# Altium PCB Single_ETU_b_rev1.PcbDoc (part 4 of 6)
Units mil, origin at the board's own origin, x right, y up, seen from the top; angles counter-clockwise.
Board outline 5341 x 2710 mil, 10 copper layers (Top Layer, GND1, Signal 1, GND2, VDDA, VDD, GND3, Signal 2, GND4, Bottom Layer), stack 59.76 mil thick; 283 components, 478 nets, 1863 pads, 875 vias.
Unrouted connection lines stored in the file: 3.
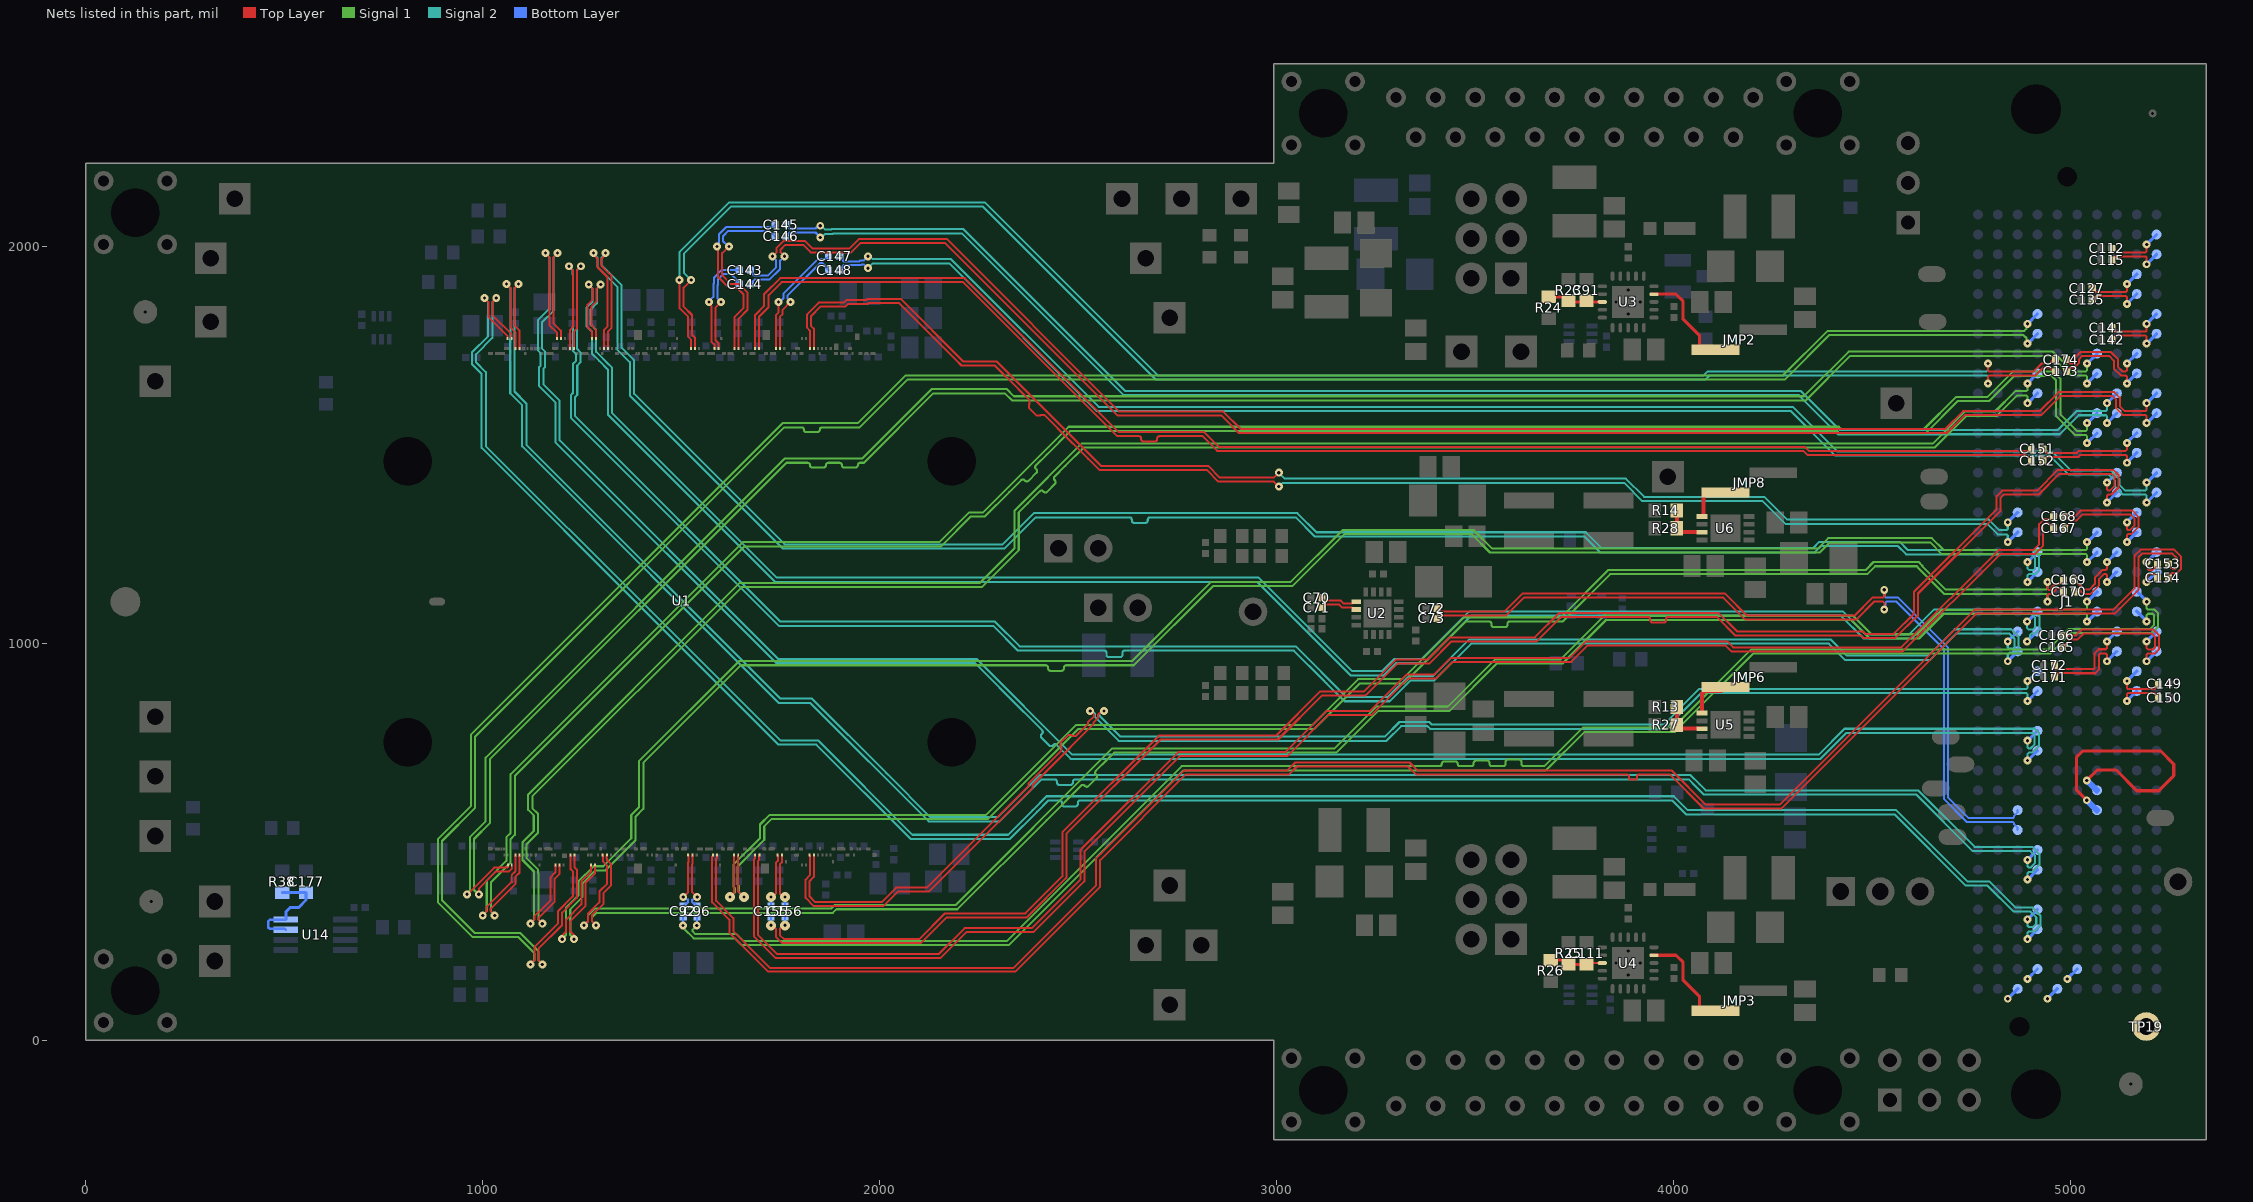
[diagram p12: the nets of this part, all layers, seen from the top]

## Via types
v1: diameter 20, hole 8, Top Layer to Bottom Layer, tented bottom, 402 vias
v2: diameter 20, hole 8, Top Layer to Bottom Layer, 199 vias
v3: diameter 30, hole 16, Top Layer to Bottom Layer, 160 vias
v4: diameter 20, hole 8, Top Layer to Bottom Layer, tented top, 89 vias
v5: diameter 18, hole 8, Top Layer to Bottom Layer, 6 vias
v6: diameter 18/25/25/25/25/18 (per signal layer), hole 8, Top Layer to Bottom Layer, tented bottom, 4 vias
v7: diameter 18/20/20/20/20/18 (per signal layer), hole 8, Top Layer to Bottom Layer, tented bottom, 4 vias
v8: diameter 80, hole 42, Top Layer to Bottom Layer, 2 vias
v9: diameter 18/25/25/25/25/18 (per signal layer), hole 8, Top Layer to Bottom Layer, 2 vias
v10: diameter 20/20/20/20/20/18 (per signal layer), hole 8, Top Layer to Bottom Layer, tented bottom, 2 vias
v11: diameter 40/20/20/20/20/40 (per signal layer), hole 8, Top Layer to Bottom Layer, 2 vias
v12: diameter 20/20/20/20/20/18 (per signal layer), hole 8, Top Layer to Bottom Layer, 1 vias
v13: diameter 40/20/20/20/20/40 (per signal layer), hole 8, Top Layer to Bottom Layer, tented top, 1 vias
v14: diameter 20, hole 8, Top Layer to Bottom Layer, tented both sides, 1 vias

## Nets (pads, with @x,y where several pads share a name; then routed paths per layer and width w, separated by ;. In a path a pad name is that pad's centre, name@x,y a point inside that pad or via, vN(x,y) a via of type N, cw(c..) or ccw(c..) an arc to the next point about the centre after c; other vN are vias at no path point) (continued)
S3B_N: C96.1 U1.79 | length 149.2
  Top Layer w5.04: U1.79@1527.77,466.75 1527.77,443.82 1527.52,443.57 1527.52,373.48 v7(1540,361)
  Bottom Layer w5.04: C96.1@1540,339 1533.52,345.48 1530.47,345.48 1527.52,348.43 1527.52,355.2 1527.87,355.56 1531.05,355.56 1536.49,361 v7(1540,361) ; v7@1540,360.85 v7@1540.07,360.93
S3B_P: C92.1 U1.78 | length 149.4
  Top Layer w5.04: v7(1505,361) 1517.48,373.48 1517.48,447.73 1517.73,447.98 1517.73,466.75 U1.78@1517.5,467
  Bottom Layer w5.04: C92.1@1505,339 1511.48,345.48 1514.53,345.48 1517.48,348.43 1517.48,355.2 1517.13,355.56 1513.95,355.56 1508.51,361 v7(1505,361)
S3T_N: C173.1 U1.226 | length 3997.9
  Top Layer w5.04: v2(1525,1915) 1506.04,1896.04 1506.04,1848.16 1527.04,1827.16 1527.04,1776.93 1534.5,1769.47 U1.226@1534.5,1743 ; v1(4791,1655) 4791,1672.03 4793.95,1674.98 4910.98,1674.98 4930.98,1694.98 4946.57,1694.98 4949.52,1692.03 4949.52,1691.48 C173.1@4956,1685
  Signal 2 w5.16: v2(1525,1915) 1506.66,1933.34 1506.66,1981.66 1625,2100 2260,2100 2695.66,1664.34 4079.41,1664.34 4089.74,1674.67 4437.57,1674.67 4787.98,1674.67 4791,1671.65 v1(4791,1655)
S3T_P: C174.1 U1.225 | length 4000.3
  Top Layer w5.04: v2(1495,1915) 1496,1914 1496,1844 1517,1823 1517,1772.78 1524,1765.78 U1.225@1524,1743 ; v1(4791,1705) 4791,1687.97 4793.95,1685.02 4906.82,1685.02 4926.82,1705.02 4946.57,1705.02 4949.52,1707.97 4949.52,1708.52 C174.1@4956,1715
  Signal 2 w5.16: v2@1496,1915 1496,1986.07 1620.58,2110.66 2264.41,2110.66 2700.07,1675 4075,1675 4085.33,1685.33 4441.98,1685.33 4787.98,1685.33 4791,1688.35 v1(4791,1705)
S4B_N: C154.1 U1.89 | length 4588.8
  Top Layer w5.04: U1.89@1590.5,467 1590.48,460.42 1587.48,457.42 1587.48,416.89 1587.53,416.84 1587.53,351.74 1631.04,308.23 1631.04,275.16 1723.16,183.04 2046.21,183.04 2337.16,183.04 2545,390.88 2545,417.69 2545,458.39 2557.94,471.33 2766.65,680.04 3026.65,680.04 3046.61,700 3334.19,700 3354.16,680.04 3863.15,680.04 3994.16,680.04 4080.16,594.04 4266.52,594.04 4757.52,1085.04 5106.84,1085.04 5159.96,1138.16 5159.96,1220.48 5175.52,1236.04 5259.96,1236.04 5278,1218 5278,1188 5267.48,1177.48 5255.43,1177.48 5252.48,1174.53 5252.48,1171.48 C154.1@5246,1165
S4B_P: C153.1 U1.88 | length 4590.5
  Top Layer w5.04: U1.88@1580,467 1580,465.54 1577.44,462.98 1577.44,412.73 1577.49,412.68 1577.49,347.58 1621,304.08 1621,271 1719,173 1723.15,173 2051.22,173 2341.32,173 2555.04,386.72 2555.04,421.85 2555.04,454.23 2770.81,670 3030.8,670 3050.77,689.96 3330.04,689.96 3350,670 3778.53,670 3882.02,670 cw(c3882.02,664.96) 3887.06,664.96 3887.06,660.3 ccw(c3890.07,660.3) 3890.07,657.29 3904.09,657.29 ccw(c3904.09,660.3) 3907.1,660.3 3907.1,664.96 cw(c3912.14,664.96) 3912.14,670 3914.66,670 3990,670 4076,584 4270.68,584 4761.68,1075 5111,1075 5170,1134 5170,1216.32 5179.68,1226 5255.81,1226 5267.96,1213.84 5267.96,1192.16 5263.32,1187.52 5255.43,1187.52 5252.48,1190.47 5252.48,1193.52 C153.1@5246,1200
S4T_N: C144.1 U1.236 | length 260.2
  Top Layer w5.04: U1.236@1594,1743 1593.77,1743.23 1593.77,1756.43 1586.04,1764.16 1586.04,1797.01 1586.04,1845.59 1597.97,1857.52 v2@1601.52,1857.52
  Bottom Layer w5.04: v2@1600.49,1860 1591.04,1869.46 1591.04,1902.07 1592.56,1903.59 1592.56,1917.38 1605.14,1929.96 1626.04,1929.96 1639.52,1916.48 1639.52,1911.48 C144.1@1646,1905
  other v2: 1600,1860
S4T_P: C143.1 U1.235 | length 261.2
  Top Layer w5.04: v2@1569.55,1860 1569.55,1856.4 1576,1849.95 1576,1848.54 1576,1801.16 1576,1760 1583.73,1752.27 1583.73,1744.73 1583.5,1744.5 U1.235@1583.5,1743
  Bottom Layer w5.04: v2@1569,1860 1569,1860.91 1581,1872.91 1581,1906.22 1582.52,1907.74 1582.52,1921.54 1600.98,1940 C143.1@1646,1940
  other v2: 1570,1860
S5B_N: C170.1 U1.97 | length 3962.3
  Top Layer w5.04: U1.97@1643.27,465.27 1643.27,404.77 1643.27,375.34 v9(1657.61,361) ; v1(4941,1105) 4941,1122.03 4943.95,1124.98 4952.28,1124.98 4961.11,1133.81 4961.11,1136.65 4964.44,1139.98 4971.57,1139.98 4974.52,1137.03 4974.52,1136.48 C170.1@4981,1130
  Signal 1 w5.16: v9(1657.61,361) 1645.43,373.17 1645.43,389.06 1642,392.49 1642,438 1709,505 1709,539.34 1727,557.34 2272.41,557.34 2499.42,784.34 3094.42,784.34 3209.42,899.34 3320.42,899.34 3476.25,1055.17 3491.99,1055.17 3534.73,1055.17 cw(c3534.73,1049.15) 3540.75,1049.15 3540.75,1046.92 ccw(c3546.77,1046.92) 3546.77,1040.9 3574.89,1040.9 ccw(c3574.89,1046.92) 3580.91,1046.92 3580.91,1049.15 cw(c3586.93,1049.15) 3586.93,1055.17 3675,1055.17 3720.39,1055.17 3839.56,1174.34 4487.32,1174.34 4507.32,1194.34 4611.94,1194.34 4614.96,1191.32 4614.96,1190.18 4680.48,1124.67 4918.16,1124.67 4937.98,1124.67 4941,1121.65 v1(4941,1105)
S5B_P: C169.1 U1.96 | length 3962
  Top Layer w5.04: v9(1622.61,361) 1633.23,371.63 1633.23,400.62 1633.23,466.77 U1.96@1633,467 ; v1(4941,1155) 4941,1137.97 4943.95,1135.02 4948.12,1135.02 4951.07,1137.97 4951.07,1140.81 4960.29,1150.02 4971.57,1150.02 4974.52,1152.97 4974.52,1153.52 C169.1@4981,1160
  Signal 1 w5.16: v9(1622.61,361) 1634.78,373.17 1634.78,383.8 1631.34,387.23 1631.34,442.41 1698.34,509.41 1698.34,543.76 1722.59,568 2268,568 2495,795 3090,795 3205,910 3316,910 3471.83,1065.83 3715.98,1065.83 3835.15,1185 4482.91,1185 4502.91,1205 4616.36,1205 4625.62,1195.73 4625.62,1194.6 4684.89,1135.33 4912.84,1135.33 4937.98,1135.33 4941,1138.35 v1(4941,1155)
S5T_N: C146.1 U1.244 | length 487.3
  Top Layer w5.04: v2(1620,2000) 1603.04,1983.04 1603.04,1954.51 1603.04,1926.96 1625,1905 1645,1905 1667,1883 1667,1841 1644.27,1818.27 1644.27,1743.23 U1.244@1644.5,1743
  Bottom Layer w5.04: v2(1620,2000) 1618,2000 1605,2013 1605,2026 1618,2039 1722,2039 C146.1@1736,2025
S5T_P: C145.1 U1.243 | length 489.5
  Top Layer w5.04: v2(1590,2000) 1592.48,1997.52 1592.48,1991.09 1593,1990.57 1593,1922.81 1620.84,1894.96 1640.84,1894.96 1656.96,1878.84 1656.96,1845.16 1634.23,1822.43 1634.23,1744.73 1634,1744.5 U1.243@1634,1743
  Bottom Layer w5.04: v2(1590,2000) 1590,2003.51 1594.96,2008.47 1594.96,2030.16 1613.84,2049.04 1730.04,2049.04 C145.1@1736,2055
S6B_N: C168.1 U1.105 | length 4027.5
  Top Layer w5.04: U1.105@1696.5,467 1696.5,465.5 1696.27,465.27 1696.27,454.73 1693,451.46 1693,266.3 1742.2,217.1 2147.9,217.1 2213.75,282.94 2382.9,282.94 2504.96,405 2504.96,479.16 2512.94,487.13 2752.84,727.04 3022.84,727.04 3125.8,830 3235,830 3327.04,922.04 3367.06,922.04 3397.04,922.04 3438.55,963.55 3737.64,963.55 3779.13,1005.04 4134.16,1005.04 4149.16,990.04 4572.84,990.04 4817.81,1235 4904.81,1235 4919.96,1250.16 4919.96,1300.16 4933.76,1313.95 4949.95,1313.95 C168.1@4956,1320
S6B_P: C167.1 U1.104 | length 4047.4
  Top Layer w5.04: U1.104@1686,467 1686.23,466.77 1686.23,458.89 1682.96,455.62 1682.96,262.14 1738.04,207.06 1742.2,207.06 2016.28,207.06 2152.06,207.06 2217.9,272.9 2387.06,272.9 2515,400.84 2515,475 2757,717 3027,717 3129.96,819.96 3239.16,819.96 3331.2,912 3362.9,912 3401.2,912 3442.71,953.51 3741.8,953.51 3783.29,995 4130,995 4145,980 4577,980 4821.96,1224.96 4908.96,1224.96 4930,1246 4930,1296 4937.91,1303.91 4942.09,1303.91 C167.1@4956,1290
S6T_N: C152.1 U1.252 | length 3541.9
  Top Layer w5.04: U1.252@1696,1743 1695.98,1745.98 1695.77,1746.2 1695.77,1767.58 1695.77,1822.77 1720.26,1847.26 1720.26,1877.26 1752.96,1909.96 2210.04,1909.96 2598,1522 2609.87,1522 2652.43,1522 cw(c2652.43,1515.99) 2658.44,1515.99 2658.44,1514.48 ccw(c2664.44,1514.48) 2664.44,1508.47 2692.47,1508.47 ccw(c2692.47,1514.48) 2698.47,1514.48 2698.47,1515.99 cw(c2704.48,1515.99) 2704.48,1522 2744.01,1522 2812.93,1522 2849.93,1485 2910.86,1485 4325.81,1485 4336.81,1474 4345.12,1474 4887,1474 C152.1@4901,1460
S6T_P: C151.1 U1.251 | length 3538.5
  Top Layer w5.04: U1.251@1685.5,1743 1685.5,1744.5 1685.73,1744.73 1685.73,1826.93 1708.87,1850.06 1708.87,1880.06 1748.81,1920 2214.19,1920 2602.16,1532.04 2817.09,1532.04 2854.09,1495.04 4329.96,1495.04 4340.97,1484.04 4887,1484.04 4895.04,1484.04 C151.1@4901,1490
S7B_N: C156.1 U1.113 | length 137.5
  Top Layer w5.04: U1.113@1754,467 1754,465.5 1753.27,464.77 1753.27,448.29 1748.52,443.54 1748.52,369.97 1757.49,361 v6(1761,361)
  Bottom Layer w5.04: C156.1@1761,339 v6(1761,361)
S7B_P: C155.1 U1.112 | length 137.5
  Top Layer w5.04: v6(1726,361) 1729.51,361 1738.48,369.97 1738.48,447.69 1743.23,452.44 1743.23,466.27 U1.112@1742.5,467
  Bottom Layer w5.04: C155.1@1726,339 v6(1726,361)
S7T_N: C148.1 U1.260 | length 297.9
  Top Layer w5.04: U1.260@1748.5,1743 1748.27,1743.23 1748.27,1822.69 1755.04,1829.46 1755.04,1840.04 v2(1775,1860)
  Bottom Layer w5.04: v2@1780,1860 1776.49,1860 1767.76,1868.73 1767.76,1876.37 1849.39,1958 1856,1958 1864.52,1949.48 1864.52,1946.48 C148.1@1871,1940
S7T_P: C147.1 U1.259 | length 300.6
  Top Layer w5.04: U1.259@1738,1743 1738,1744.5 1738.23,1744.73 1738.23,1826.85 1745,1833.61 v2(1745,1860)
  Bottom Layer w5.04: v2(1745,1860) 1748.51,1860 1757.24,1868.73 1757.24,1880.73 1845.03,1968.52 1864.52,1968.52 C147.1@1871,1975
SC_CLOCK_IN_B_N: J1.D9 U1.10 | length 5049.6
  Top Layer w5: 1073,432.86 U1.10@1073,442
  Top Layer w5.04: v2(990,368) 991,369 991,383 1033,425 1065.14,425 1073,432.86
  Signal 1 w5.16: v2(990,368) 989,368 978,379 978,507.34 1018,547.34 1018,707.93 1765.07,1455 1775.43,1455 1818.17,1455 cw(c1818.17,1448.98) 1824.19,1448.98 ; 1824.19,1448.97 ccw(c1830.22,1448.97) 1830.22,1442.95 1858.33,1442.95 ccw(c1858.33,1448.97) 1864.35,1448.97 ; 1864.35,1448.98 cw(c1870.38,1448.98) 1870.38,1455 1898.49,1455 cw(c1898.49,1448.98) 1904.51,1448.98 ; 1904.51,1448.97 ccw(c1910.54,1448.97) 1910.54,1442.95 1938.65,1442.95 ccw(c1938.65,1448.97) 1944.67,1448.97 ; 1944.67,1448.98 cw(c1950.69,1448.98) 1950.69,1455 1960.07,1455 1960.84,1455.76 2135.07,1630 2315,1630 2333.12,1611.88 4332.1,1611.88 4444.56,1724.34 4950.66,1724.34 5000.33,1674.67 5037.98,1674.67 5041,1671.65 v1(5041,1655)
  Bottom Layer w8: v1(5041,1655) J1.D9@5066,1680
SC_CLOCK_IN_B_P: J1.D8 U1.9 | length 5046.6
  Top Layer w5: 1063,437.05 U1.9@1063,442
  Top Layer w5.04: v2(960,368) 961.81,368 1028.84,435.04 1060.98,435.04 1062.97,437.03
  Signal 1 w5.16: v2(960,368) 960,371.1 967.34,378.44 967.34,511.76 1007.34,551.76 1007.34,712.34 1760.66,1465.66 1955.66,1465.66 2130.66,1640.66 2319.41,1640.66 2337.54,1622.54 4327.69,1622.54 4440.15,1735 4955.07,1735 5004.74,1685.33 5037.98,1685.33 5041,1688.35 v1(5041,1705)
  Bottom Layer w8: v1(5041,1705) J1.D8@5066,1730
SC_CLOCK_IN_T_N: J1.G37 U1.157 | length 5132.7
  Top Layer w5.04: v1(1034,1870) 1034,1869.55 1024.02,1859.57 1024.02,1826.91 1072.77,1778.16 1072.77,1768.23 U1.157@1073,1768
  Signal 2 w5.16: v1(1034,1870) 1034,1869.23 1024.33,1859.56 1024.33,1769.39 983.47,1728.53 983.47,1707.53 1008,1683 1008,1497 1421.85,1083.15 1749.34,755.66 1844.34,755.66 2081.92,518.08 2323.08,518.08 2384.93,579.93 2420,615 4000.07,615 4035.07,580 4560.07,580 4739.42,400.66 4794.42,400.66 4860.07,335 4902.84,335 4923.42,314.41 4923.42,289.73 4908.37,274.67 4894.02,274.67 4891,271.65 v1(4891,255)
  Bottom Layer w8: v1(4891,255) J1.G37@4916,280
SC_CLOCK_IN_T_P: J1.G36 U1.156 | length 5134.7
  Top Layer w5.04: v2(1004,1870) 1004,1869.55 1013.98,1859.57 1013.98,1822.75 1062.73,1774 1062.73,1769.73 1062.5,1769.5 U1.156@1062.5,1768
  Signal 2 w5.16: v2(1004,1870) 1004,1869.23 1013.67,1859.56 1013.67,1773.81 972.81,1732.95 972.81,1703.12 997.34,1678.58 997.34,1492.58 1411.19,1078.73 1744.93,745 1839.93,745 2077.51,507.42 2327.49,507.42 2396.23,576.16 2424.41,604.34 2434.98,604.34 2452.6,604.34 cw(c2452.6,598.32) 2458.63,598.32 2458.63,595.36 ccw(c2464.65,595.36) 2464.65,589.34 2492.76,589.34 ccw(c2492.76,595.36) 2498.78,595.36 2498.78,598.32 cw(c2504.81,598.32) 2504.81,604.34 2507.39,604.34 3995.66,604.34 4030.66,569.34 4555.66,569.34 4735,390 4790,390 4855.66,324.34 4898.42,324.34 4912.76,310 4912.76,294.14 4903.95,285.33 4894.02,285.33 4891,288.35 v1(4891,305)
  Bottom Layer w8: v1(4891,305) J1.G36@4916,330
SC_CLOCK_OUT_B_N: J1.G7 U1.32 | length 5497.9
  Top Layer w5: 1231,436 1237.03,429.97
  Top Layer w5.04: v2(1150,191) 1150,191.43 1140,201.43 1140,230.81 1199.99,290.8 1199.99,321.8 1237.03,358.84 1237.03,429.97 ; U1.32@1231,467 1231,465.5 1231,436 1231.06,435.94
  Signal 1 w5.16: v2(1150,191) 1150,191.77 1140.33,201.44 1140.33,224.67 1094.34,270.66 979.41,270.66 897.42,352.65 897.42,502.42 980.66,585.66 980.66,765.58 1759.42,1544.34 1760,1544.34 1802.74,1544.34 cw(c1802.74,1538.32) 1808.76,1538.32 ccw(c1814.79,1538.32) 1814.79,1532.29 1842.9,1532.29 ccw(c1842.9,1538.32) 1848.92,1538.32 cw(c1854.95,1538.32) 1854.95,1544.34 1880.17,1544.34 1949.34,1544.34 2069.34,1664.34 4279.34,1664.34 4391.76,1776.76 4880.56,1776.76 4888.16,1769.16 4888.16,1757.84 v1(4891,1755)
  Bottom Layer w8: v1(4891,1755) J1.G7@4916,1780
SC_CLOCK_OUT_B_P: J1.G6 U1.31 | length 5498.9
  Top Layer w5.04: v2(1120,191) 1120,191.74 1129.7,201.43 1129.7,231.18 1129.96,231.45 1129.96,234.96 1189.96,294.96 1189.96,325.96 1227,363 1227,425.81 1220.96,431.84 1220.96,466.54 U1.31@1220.5,467
  Signal 1 w5.16: v2(1120,191) 1120,191.77 1129.67,201.44 1129.67,220.26 1089.93,260 975,260 886.76,348.24 886.76,506.84 970,590.07 970,770 1755,1555 1944.93,1555 2064.93,1675 4274.93,1675 4387.35,1787.42 4882.65,1787.42 4888.16,1792.93 4888.16,1802.16 v1(4891,1805)
  Bottom Layer w8: v1(4891,1805) J1.G6@4916,1830
SC_CLOCK_OUT_T_N: J1.H23 U1.179 | length 4763.8
  Top Layer w5: U1.179@1230,1743 1230,1785.83 1234.17,1790 ; 1234.19,1790 1237.04,1792.84
  Top Layer w5.04: 1237.02,1922.03 1237.02,1939.57 1247,1949.55 v2(1247,1950) ; 1237.04,1792.84 1237.04,1922.01
  Signal 2 w5.16: v2(1247,1950) 1247,1949.23 1237.33,1939.56 1237.33,1934.25 1237.42,1934.16 1237.42,1741.72 1246.02,1733.12 1246.02,1707.69 1238,1699.67 1238,1626.25 1232.42,1620.67 1232.42,1572.58 1750,1055 2290.07,1055 2352.44,992.63 3047.37,992.63 3175.04,864.96 3279.96,864.96 3332.54,917.54 3392.46,917.54 3484.93,1010 4394.6,1010 4435.2,969.4 4641.01,969.4 4707.27,1035.66 4849.41,1035.66 4868.66,1016.41 4868.66,983.58 4861.68,976.6 4845.95,976.6 4841,971.65 v1(4841,955)
  Bottom Layer w8: v1(4841,955) J1.H23@4866,980
SC_CLOCK_OUT_T_P: J1.H22 U1.178 | length 4765
  Top Layer w5: U1.178@1220,1743 1220,1790
  Top Layer w5.04: v2(1217,1950) 1217,1949.55 1226.98,1939.57 1226.98,1917.87 1227,1797 1220,1790
  Signal 2 w5.16: v2(1217,1950) 1217,1949.23 1226.67,1939.56 1226.67,1929.84 1226.76,1929.74 1226.76,1737.3 1235.36,1728.71 1235.36,1712.1 1227.34,1704.09 1227.34,1630.67 1221.76,1625.09 1221.76,1568.16 1745.58,1044.34 2285.66,1044.34 2348.03,981.97 2478.97,981.97 2564.94,981.97 cw(c2564.94,975.95) 2570.96,975.95 2570.96,971.52 ccw(c2576.98,971.52) 2576.98,965.49 2605.1,965.49 ccw(c2605.1,971.52) 2611.12,971.52 2611.12,975.95 cw(c2617.14,975.95) 2617.14,981.97 2619.72,981.97 3042.95,981.97 3117.46,907.46 3125,899.93 3167.5,857.43 3170.62,854.3 3284.38,854.3 3336.95,906.88 3396.88,906.88 3489.34,999.34 4390.18,999.34 4430.78,958.74 4645.42,958.74 4711.68,1025 4845,1025 4858,1012 4858,989.68 4855.58,987.26 4844.02,987.26 4841,990.28 v1(4841,1005)
  Bottom Layer w8: v1(4841,1005) J1.H22@4866,1030
SC_DATA_IN_B_N: J1.D11 U1.11 | length 5133.6
  Top Layer w5: 1073,400 1073,417.2 ; 1073.03,417.2 1080.05,424.22 ; 1080.05,424.25 1083,427.2 U1.11@1083,467
  Top Layer w5.04: v2@1000,315.45 1009.98,325.43 1009.98,336.21 1073,399.22 1073,400
  Signal 1 w5.16: v2(1000,315) 1000,315.44 1010,325.44 1010,403 1059.58,452.58 1059.58,473.39 1059.58,511.65 1070.34,522.42 1070.34,670.41 1654.93,1255 2149.99,1255 2225.18,1330.19 2260.19,1330.19 2475.66,1545.66 4415.63,1545.66 4421.29,1540 4630,1540 4711.16,1621.16 4790.16,1621.16 4853.66,1684.66 4955.42,1684.66 4973.42,1666.65 4973.42,1576.91 5015,1535.33 5037.98,1535.33 5041,1538.35 v1(5041,1555)
  Bottom Layer w8: v1(5041,1555) J1.D11@5066,1580
SC_DATA_IN_B_P: J1.D12 U1.12 | length 5133.6
  Top Layer w5: 1083,410.03 1083,402.88 1083.04,402.84 ; 1093,423.01 1093.05,423.06 1093.05,445.37 1093,445.42 U1.12@1093,467
  Top Layer w5.04: v2@1030,315.45 1020.02,325.43 1020.02,332.05 1083.04,395.07 1083.04,402.84 ; 1083.02,410.05 1083.02,413.03 1093,423.01
  Signal 1 w5.16: v2(1030,315) 1030,316.1 1020.66,325.44 1020.66,398.58 1070.24,448.17 1070.24,478.72 1070.24,507.24 1081,518 1081,666 1659.34,1244.34 2154.41,1244.34 2229.6,1319.53 2264.6,1319.53 2325.99,1380.92 2356.21,1411.14 cw(c2360.47,1406.88) 2364.73,1411.14 2366.18,1409.7 ccw(c2370.44,1413.96) 2374.7,1409.7 2394.58,1429.57 ccw(c2390.32,1433.83) 2394.58,1438.09 2393.13,1439.54 cw(c2397.39,1443.8) 2393.13,1448.06 2420.26,1475.18 2480.07,1535 4411.22,1535 4416.88,1529.34 4634.41,1529.34 4715.58,1610.5 4794.58,1610.5 4858.07,1674 4951,1674 4962.76,1662.24 4962.76,1572.49 5010.59,1524.67 5037.98,1524.67 5041,1521.65 v1(5041,1505)
  Bottom Layer w8: v1(5041,1505) J1.D12@5066,1530
SC_DATA_IN_T_N: J1.G34 U1.159 | length 5034.9
  Top Layer w5: 1080.02,1803.98 1080.02,1843.43 ; U1.159@1093,1743 1093,1786.99
  Top Layer w5.04: 1080.02,1803.98 1080.02,1799.97 1093,1786.99 ; 1080.02,1888.6 1080.02,1894.57 1090,1904.55 v2(1090,1905) ; 1080.04,1843.45 1080.04,1888.58
  Signal 2 w5.16: v2(1090,1905) 1090,1904.23 1080.33,1894.56 1080.33,1763.86 1079.86,1763.39 1079.86,1634.51 1110,1604.36 1110,1500.66 1750,860.66 1829.34,860.66 2016.23,673.77 2020,670 2127.46,562.54 2297.46,562.54 2403.05,668.12 4041.95,668.12 4064.78,645.29 4080.07,630 4615.07,630 4757.65,487.42 4902.58,487.42 4920.66,469.34 4920.66,442.62 4902.71,424.67 4894.02,424.67 4891,421.65 v1(4891,405)
  Bottom Layer w8: v1(4891,405) J1.G34@4916,430
SC_DATA_IN_T_P: J1.G33 U1.158 | length 5034.9
  Top Layer w5: 1070.02,1848.01 1070.02,1808.15 1070,1795.82 1073.02,1792.8 1083,1782.8 U1.158@1083,1743
  Top Layer w5.04: v2(1060,1905) 1060,1904.55 1069.98,1894.57 1069.98,1884.44 ; 1070,1848.02 1070,1884.42
  Signal 2 w5.16: v2(1060,1905) 1060,1904.23 1069.67,1894.56 1069.67,1768.28 1069.2,1767.8 1069.2,1630.09 1099.34,1599.95 1099.34,1496.24 1745.59,850 1824.93,850 2123.05,551.88 2301.88,551.88 2407.46,657.46 2417.31,657.46 2440.23,657.46 cw(c2440.23,651.44) 2446.25,651.44 2446.25,649.49 ccw(c2452.28,649.49) 2452.28,643.47 2480.39,643.47 ccw(c2480.39,649.49) 2486.41,649.49 2486.41,651.44 cw(c2492.43,651.44) 2492.43,657.46 2495.01,657.46 4037.54,657.46 4054.12,640.88 4075.66,619.34 4610.66,619.34 4753.24,476.76 4898.16,476.76 4910,464.93 4910,447.03 4898.3,435.33 4894.02,435.33 4891,438.35 v1(4891,455)
  Bottom Layer w8: v1(4891,455) J1.G33@4916,480
SC_DATA_OUT_B_N: J1.G10 U1.28 | length 4840.5
  Top Layer w5: 1193,423.01 U1.28@1193,442
  Top Layer w5.04: v2(1150,294) 1150,294.45 1140.02,304.43 1140.02,308.85 1142.97,311.8 1143.8,311.8 1166.58,334.58 1180.04,348.04 1180.04,406.05 1193,419.01 1193,423.01 ; v2@1151.23,295.23 1152,294.45 v2@1152,294
  Signal 1 w5.16: v2@1150,294.77 1140,304.77 1140,421.24 1139.66,421.58 1139.66,429.93 1110.66,458.93 1110.66,494.71 1139,523.05 1139,571.07 1125,585.07 1125,615 1651.88,1141.88 2256.88,1141.88 2350,1235 2350,1329.93 2372.94,1352.87 2403.16,1383.09 cw(c2407.42,1378.83) 2411.68,1383.09 2412.91,1381.86 ccw(c2417.17,1386.12) 2421.43,1381.86 2441.3,1401.74 ccw(c2437.04,1406) 2441.3,1410.26 2440.08,1411.49 cw(c2444.34,1415.75) 2440.08,1420.01 2467.54,1447.46 2513.41,1493.34 4657.41,1493.34 4737.41,1573.34 4813.41,1573.34 4864.74,1624.67 4887.98,1624.67 4891,1621.65 v1(4891,1605)
  Bottom Layer w8: v1(4891,1605) J1.G10@4916,1630
SC_DATA_OUT_B_P: J1.G9 U1.27 | length 4838
  Top Layer w5: 1180.58,420.78 1183,423.2 U1.27@1183,442
  Top Layer w5.04: v2@1122,294 1122,296.45 1129.98,304.43 1129.98,313 1138.81,321.83 1139.64,321.83 1162.42,344.62 1170,352.19 1170,410.2 1180.58,420.78
  Signal 1 w5.16: v2@1120,294.77 1120,295.44 1129,304.44 1129,425.51 1100,454.51 1100,499.12 1128.34,527.46 1128.34,566.65 1114.34,580.65 1114.34,619.41 1647.46,1152.54 2252.46,1152.54 2339.34,1239.42 2339.34,1334.34 2509,1504 4653,1504 4733,1584 4809,1584 4860.33,1635.33 4887.98,1635.33 4891,1638.35 v1(4891,1655)
  Bottom Layer w8: v1(4891,1655) J1.G9@4916,1680
  other v2: 1120,294
SC_DATA_OUT_T_N: J1.G28 U1.175 | length 4942.9
  Top Layer w5: U1.175@1197,1768 1197,1786.99
  Top Layer w5.04: v2(1188,1983) 1188,1982.55 1178.02,1972.57 1178.02,1805.97 1196.44,1787.56 1197,1786.99
  Signal 2 w5.16: v2(1188,1983) 1188,1982.23 1178.33,1972.56 1178.33,1838.33 1149.42,1809.42 1149.42,1742.51 1156.24,1735.7 1156.24,1695.24 1152.42,1691.42 1152.42,1652.58 1193.66,1611.34 1193.66,1511.34 1744.34,960.66 2244.34,960.66 2485,720 4364.93,720 4429.93,785 4909.28,785 4919.4,774.88 4919.4,741.36 4902.71,724.67 4894.02,724.67 4891,721.65 v1(4891,705)
  Bottom Layer w8: v1(4891,705) J1.G28@4916,730
SC_DATA_OUT_T_P: J1.G27 U1.174 | length 4943
  Top Layer w5: 1186.42,1783.4 1187,1782.82 U1.174@1187,1768
  Top Layer w5.04: v2(1158,1983) 1158,1982.55 1167.98,1972.57 1167.98,1801.82 1186.4,1783.4
  Signal 2 w5.16: v2(1158,1983) 1158,1982.23 1167.67,1972.56 1167.67,1842.75 1138.76,1813.84 1138.76,1738.1 1145.58,1731.28 1145.58,1699.65 1141.76,1695.84 1141.76,1648.16 1183,1606.93 1183,1506.93 1739.93,950 2239.93,950 2360.26,829.67 2362.08,827.85 2408.72,781.2 cw(c2404.46,776.94) 2408.72,772.68 2407.31,771.27 ccw(c2411.57,767.01) 2407.31,762.75 2427.19,742.88 ccw(c2431.45,747.14) 2435.71,742.88 2437.12,744.29 cw(c2441.38,740.03) 2445.64,744.29 2447.46,742.46 2480.59,709.34 4369.34,709.34 4434.34,774.34 4904.86,774.34 4908.74,770.47 4908.74,745.77 4898.3,735.33 4894.02,735.33 4891,738.35 v1(4891,755)
  Bottom Layer w8: v1(4891,755) J1.G27@4916,780
SERIAL_OUT0_B_N: C150.2 J1.B25 | length 140.8
  Top Layer w5.04: v1(5141,855) 5141,872.03 5143.95,874.98 5179.89,874.98 5180.39,875.48 5211.57,875.48 5214.52,872.53 5214.52,869.48 C150.2@5221,863
  Bottom Layer w8: v1(5141,855) J1.B25@5166,880
SERIAL_OUT0_B_P: C149.2 J1.B24 | length 140.8
  Top Layer w5.04: v1(5141,905) 5141,887.97 5143.95,885.02 5175.73,885.02 5176.23,885.52 5211.57,885.52 5214.52,888.47 5214.52,891.52 C149.2@5221,898
  Bottom Layer w8: v1(5141,905) J1.B24@5166,930
SERIAL_OUT0_T_N: C115.2 J1.A3 | length 145.1
  Top Layer w5.04: C115.2@5104,1965 5110.48,1971.48 5110.48,1972.03 5113.43,1974.98 5188.05,1974.98 5191,1972.03 v1(5191,1955)
  Bottom Layer w8: v1(5191,1955) J1.A3@5216,1980
SERIAL_OUT0_T_P: C112.2 J1.A2 | length 145.1
  Top Layer w5.04: C112.2@5104,1995 5110.48,1988.52 5110.48,1987.97 5113.43,1985.02 5188.05,1985.02 5191,1987.97 v1(5191,2005)
  Bottom Layer w8: v1(5191,2005) J1.A2@5216,2030
SERIAL_OUT1_B_N: C166.2 J1.A23 | length 379.6
  Top Layer w5.04: C166.2@4979,1020 4996.01,1020 5012.81,1020 5027.84,1035.04 5207.48,1035.04 5222,1020.52 5222,984.81 5212.18,974.98 5193.95,974.98 5191,972.03 v1(5191,955)
  Bottom Layer w8: v1(5191,955) J1.A23@5216,980
SERIAL_OUT1_B_P: C165.2 J1.A22 | length 354.6
  Top Layer w5.04: C165.2@4979,990 4998.96,1009.96 5016.96,1009.96 5032,1025 5203.32,1025 5211.96,1016.36 5211.96,988.96 5208.02,985.02 5193.95,985.02 5191,987.97 v1(5191,1005)
  Bottom Layer w8: v1(5191,1005) J1.A22@5216,1030
SERIAL_OUT1_T_N: C135.2 J1.B5 | length 145.1
  Top Layer w5.04: C135.2@5054,1865 5060.48,1871.48 5060.48,1872.03 5063.43,1874.98 5138.05,1874.98 5141,1872.03 v1(5141,1855)
  Bottom Layer w8: v1(5141,1855) J1.B5@5166,1880
SERIAL_OUT1_T_P: C127.2 J1.B4 | length 145.1
  Top Layer w5.04: C127.2@5054,1895 5060.48,1888.52 5060.48,1887.97 5063.43,1885.02 5138.05,1885.02 5141,1887.97 v1(5141,1905)
  Bottom Layer w8: v1(5141,1905) J1.B4@5166,1930
SERIAL_OUT2_B_N: C171.2 J1.C23 | length 232.1
  Top Layer w5.04: C171.2@4959,915 4965.48,921.48 4965.48,922.03 4968.43,924.98 4983.42,924.98 ; 4983.44,925 5011.14,925 5011.34,924.8
  Top Layer w5.16: 5011.34,924.8 5061.51,924.8 5070.44,933.74 5070.44,970.68 5074.43,974.67 5087.98,974.67 5091,971.65 v1(5091,955)
  Bottom Layer w8: v1(5091,955) J1.C23@5116,980
SERIAL_OUT2_B_P: C172.2 J1.C22 | length 232.2
  Top Layer w5.04: C172.2@4959,945 4965.48,938.52 4965.48,937.97 4968.43,935.02 4979.26,935.02 ; 4979.28,935.04 5006.45,935.04 5006.51,935.1
  Top Layer w5.16: 5006.51,935.1 5006.57,935.1 5006.93,935.46 5057.09,935.46 5059.79,938.15 5059.79,975.1 5070.02,985.33 5087.98,985.33 5091,988.35 v1(5091,1005)
  Bottom Layer w8: v1(5091,1005) J1.C22@5116,1030
SERIAL_OUT2_T_N: C142.2 J1.A7 | length 145.1
  Top Layer w5.04: C142.2@5104,1765 5110.48,1771.48 5110.48,1772.03 5113.43,1774.98 5188.05,1774.98 5191,1772.03 v1(5191,1755)
  Bottom Layer w8: v1(5191,1755) J1.A7@5216,1780
SERIAL_OUT2_T_P: C141.2 J1.A6 | length 145.1
  Top Layer w5.04: C141.2@5104,1795 5110.48,1788.52 5110.48,1787.97 5113.43,1785.02 5188.05,1785.02 5191,1787.97 v1(5191,1805)
  Bottom Layer w8: v1(5191,1805) J1.A6@5216,1830
SERIAL_OUT3_B_N: C96.2 J1.B21 | length 4213.5
  Signal 1 w5.16: v7(1539,289.39) 1539,289.31 1528.63,278.94 1528.63,274.67 1535.64,267.66 1639.41,267.66 1656.41,250.66 2320.59,250.66 2760.58,690.66 3393.35,690.66 3409.42,690.66 ccw(c3409.42,696.68) 3415.44,696.68 cw(c3421.47,696.68) 3421.47,702.71 3449.58,702.71 cw(c3449.58,696.68) 3455.6,696.68 ccw(c3461.63,696.68) 3461.63,690.66 3489.74,690.66 ccw(c3489.74,696.68) 3495.76,696.68 3495.76,698.58 cw(c3501.78,698.58) 3501.78,704.6 3529.9,704.6 cw(c3529.9,698.58) 3535.92,698.58 3535.92,696.68 ccw(c3541.94,696.68) 3541.94,690.66 3570.05,690.66 ccw(c3570.05,696.68) 3576.08,696.68 3576.08,701.43 cw(c3582.1,701.43) 3582.1,707.46 3610.21,707.46 cw(c3610.21,701.43) 3616.24,701.43 3616.24,696.68 ccw(c3622.26,696.68) 3622.26,690.66 3665,690.66 3673.66,690.66 3770.94,787.94 3997.87,787.94 4194.96,985.04 4943.46,985.04 4995.09,1036.66 5199.66,1036.66 5209,1046 5209,1071.65 5205.98,1074.67 5201.32,1074.67 5194.02,1074.67 5191,1071.65 v1(5191,1055)
  Bottom Layer w5.04: v7(1539,289.39) 1539,310 C96.2@1540,311
  Bottom Layer w8: J1.B21@5166,1081 v1@5191,1056
SERIAL_OUT3_B_P: C92.2 J1.B20 | length 4213.4
  Signal 1 w5.16: v7(1504,289.39) 1506.84,286.55 1506.84,281.39 1531.23,257 1635,257 1652,240 2325,240 2765,680 3678.07,680 3775.36,777.28 4002.28,777.28 4199.38,974.38 4947.88,974.38 4999.5,1026 5204.07,1026 5219.66,1041.58 5219.66,1076.06 5210.39,1085.33 5205.73,1085.33 5194.02,1085.33 5191,1088.35 v1(5191,1105)
  Bottom Layer w5.04: v7(1504,289.39) 1504,310 C92.2@1505,311
  Bottom Layer w8: J1.B20@5166,1131 v1@5191,1106
SERIAL_OUT3_T_N: C173.2 J1.B9 | length 259.5
  Top Layer w5.04: C173.2@4989,1685 4995.48,1691.48 4995.48,1692.03 4998.43,1694.98 5009.16,1694.98 5020,1705.82 5020,1715 5029,1724 5096.78,1724 5108.52,1712.26 5108.52,1692.29 5125.82,1674.98 5138.05,1674.98 5141,1672.03 v1(5141,1655)
  Bottom Layer w8: v1(5141,1655) J1.B9@5166,1680
SERIAL_OUT3_T_P: C174.2 J1.B8 | length 259.5
  Top Layer w5.04: C174.2@4989,1715 4995.48,1708.52 4995.48,1707.97 4998.43,1705.02 5005,1705.02 5009.96,1709.98 5009.96,1719.16 5024.84,1734.04 5100.93,1734.04 5118.56,1716.41 5118.56,1696.44 5129.98,1685.02 5138.05,1685.02 5141,1687.97 v1(5141,1705)
  Bottom Layer w8: v1(5141,1705) J1.B8@5166,1730
SERIAL_OUT4_B_N: C154.2 J1.A19 | length 84.1
  Top Layer w5.04: v1(5191,1155) 5193,1157 5193,1172.03 5195.95,1174.98 5204.28,1174.98 5204.39,1175.1 5208.57,1175.1 5211.52,1172.14 5211.52,1171.48 C154.2@5218,1165
  Bottom Layer w8: v1(5191,1155) J1.A19@5216,1180
SERIAL_OUT4_B_P: C153.2 J1.A18 | length 87.4
  Top Layer w5.04: v1(5191,1205) 5193,1203 5193,1187.97 5195.95,1185.02 5200.12,1185.02 5200.24,1185.13 5206.18,1185.13 5211.52,1190.47 5211.52,1193.52 C153.2@5218,1200
  Bottom Layer w8: v1(5191,1205) J1.A18@5216,1230
SERIAL_OUT4_T_N: C144.2 J1.A11 | length 3935.1
  Top Layer w5.04: v2(1760,1975) 1750.02,1984.98 1750.02,1992.07 1761.91,2003.96 1806.84,2003.96 1825.84,1984.96 1927.96,1984.96 1951.96,2008.96 2163.94,2008.96 2599.38,1573.52 2861.09,1573.52 2904.65,1529.96 2937.19,1529.96 4330.81,1529.96 4687.77,1529.96 4732.79,1574.98 4925.18,1574.98 4973.1,1622.9 5105.42,1622.9 5113.44,1614.88 5113.44,1593.59 5132.05,1574.98 5188.05,1574.98 5191,1572.03 v1(5191,1555)
  Bottom Layer w5.04: C144.2@1674,1905 1685,1916 1704.08,1916 1722,1916 1749,1943 1749,1964 v2(1760,1975)
  Bottom Layer w8: v1(5191,1555) J1.A11@5216,1580
SERIAL_OUT4_T_P: C143.2 J1.A10 | length 3938.1
  Top Layer w5.04: v2(1730,1975) 1739.98,1984.98 1739.98,1996.23 1757.76,2014 1811,2014 1830,1995 1923.81,1995 1947.81,2019 2168.1,2019 2603.54,1583.56 2865.25,1583.56 2908.81,1540 4683.61,1540 4728.63,1585.02 4921.02,1585.02 4968.94,1632.94 5109.58,1632.94 5123.48,1619.04 5123.48,1597.74 5136.21,1585.02 5188.05,1585.02 5191,1587.97 v1(5191,1605)
  Bottom Layer w5.04: C143.2@1674,1940 1680.48,1933.52 1680.48,1928.99 1683.43,1926.04 1708.24,1926.04 1717.84,1926.04 1738.96,1947.16 1738.96,1961.95 1738.96,1965.57 1730,1974.53 v2(1730,1975)
  Bottom Layer w8: v1(5191,1605) J1.A10@5216,1630
SERIAL_OUT5_B_N: C170.2 J1.C19 | length 171.5
  Top Layer w5.04: C170.2@5009,1130 5013.43,1134.43 5022.61,1134.43 5032.03,1125 5049.97,1125 5070.47,1145.5 5070.47,1161.58 5083.88,1174.98 5088.05,1174.98 5091,1172.03 v1(5091,1155)
  Bottom Layer w8: v1(5091,1155) J1.C19@5116,1180
SERIAL_OUT5_B_P: C169.2 J1.C18 | length 176.2
  Top Layer w5.04: C169.2@5009,1160 5015.48,1153.52 5015.48,1152.97 5023.99,1144.46 5026.76,1144.46 5036.01,1135.22 5045.99,1135.22 5060.44,1149.66 5060.44,1165.73 5079.72,1185.02 5088.05,1185.02 5091,1187.97 v1(5091,1205)
  Bottom Layer w8: v1(5091,1205) J1.C18@5116,1230
SERIAL_OUT5_T_N: C146.2 J1.C11 | length 3624.4
  Signal 2 w5.16: v2(1850,2022) 1853.27,2022 1862.94,2031.67 1881.98,2031.67 1882.89,2032.58 2206.42,2032.58 2614,1625 4315,1625 4413.24,1526.76 4971.76,1526.76 5019.67,1574.67 5087.98,1574.67 5091,1571.65 v1(5091,1555)
  Bottom Layer w5.04: C146.2@1764,2025 1770.48,2031.48 1770.48,2032.03 1773.43,2034.98 1804.52,2034.98 1838.02,2034.98 1850,2023 v2(1850,2022)
  Bottom Layer w8: v1(5091,1555) J1.C11@5116,1580
SERIAL_OUT5_T_P: C145.2 J1.C10 | length 3621.3
  Signal 2 w5.16: v2(1850,2052) 1853.27,2052 1862.94,2042.33 1877.56,2042.33 1878.47,2043.24 2210.84,2043.24 2618.41,1635.66 4319.41,1635.66 4417.65,1537.42 4967.35,1537.42 5015.26,1585.33 5087.98,1585.33 5091,1588.35 v1(5091,1605)
  Bottom Layer w5.04: C145.2@1764,2055 1770.48,2048.52 1770.48,2047.97 1773.43,2045.02 1800.36,2045.02 1838.02,2045.02 1845,2052 v2(1850,2052)
  Bottom Layer w8: v1(5091,1605) J1.C10@5116,1630
SERIAL_OUT6_B_N: C168.2 J1.B17 | length 315.9
  Top Layer w5.04: C168.2@4984,1320 5010.54,1320 5025.57,1335.04 5154.11,1335.04 5170.89,1318.26 5170.89,1293.59 5152.28,1274.98 5143.95,1274.98 5141,1272.03 v1(5141,1255)
  Bottom Layer w8: v1(5141,1255) J1.B17@5166,1280
SERIAL_OUT6_B_P: C167.2 J1.B16 | length 291
  Top Layer w5.04: C167.2@4984,1290 5003.96,1309.96 5014.69,1309.96 5029.73,1325 5149.95,1325 5160.85,1314.1 5160.85,1297.75 5148.12,1285.02 5143.95,1285.02 5141,1287.97 v1(5141,1305)
  Bottom Layer w8: v1(5141,1305) J1.B16@5166,1330
SERIAL_OUT6_T_N: C152.2 J1.B13 | length 272.1
  Top Layer w5.04: C152.2@4929,1460 4935.48,1466.48 4935.48,1467.03 4938.43,1469.98 5019.18,1469.98 5024.18,1474.98 5138.05,1474.98 5141,1472.03 v1(5141,1455)
  Bottom Layer w8: v1(5141,1455) J1.B13@5166,1480
SERIAL_OUT6_T_P: C151.2 J1.B12 | length 272.1
  Top Layer w5.04: C151.2@4929,1490 4935.48,1483.52 4935.48,1482.97 4938.43,1480.02 5015.02,1480.02 5020.02,1485.02 5138.05,1485.02 5141,1487.97 v1(5141,1505)
  Bottom Layer w8: v1(5141,1505) J1.B12@5166,1530
SERIAL_OUT7_B_N: C156.2 J1.C15 | length 4205.4
  Top Layer w5.04: v6(1761,290) 1757.49,290 1748.52,281.03 1748.52,265.45 1758.97,255 2099.19,255 2164.19,320 2366.64,320 2460,413.36 2460,524.19 2703.84,768.04 2998.84,768.04 3109.77,878.97 3219.78,878.97 3300.84,960.04 3380.84,960.04 3435.8,1015 3650,1015 3712.04,1077.04 4112.16,1077.04 4159.19,1030 4475.85,1030 4481.82,1024.04 4554.04,1024.04 4604.93,1074.93 4604.93,1129.93 4812.96,1337.96 4812.96,1370.96 4827.02,1385.02 4915.02,1385.02 4967.1,1437.1 5107.1,1437.1 5120.04,1424.16 5120.04,1392.74 5102.28,1374.98 5093.95,1374.98 5091,1372.03 v1(5091,1355)
  Bottom Layer w5.04: v6(1761,290) C156.2@1761,311
  Bottom Layer w8: v1(5091,1355) J1.C15@5116,1380
SERIAL_OUT7_B_P: C155.2 J1.C14 | length 4207.5
  Top Layer w5.04: v6(1726,290) 1729.51,290 1738.48,281.03 1738.48,261.29 1754.81,244.96 2103.35,244.96 2168.35,309.96 2370.79,309.96 2470.04,409.21 2470.04,520.04 2708,758 3003,758 3113.93,868.93 3223.93,868.93 3305,950 3385,950 3439.96,1004.96 3654.16,1004.96 3716.19,1067 3743.25,1067 3934.4,1067 cw(c3934.4,1060.99) 3940.4,1060.99 3940.4,1058.48 ccw(c3946.41,1058.48) 3946.41,1052.47 3974.43,1052.47 ccw(c3974.43,1058.48) 3980.44,1058.48 3980.44,1060.99 cw(c3986.45,1060.99) 3986.45,1067 3988.96,1067 4108,1067 4155.04,1019.96 4471.04,1019.96 4477,1014 4558.19,1014 4614.96,1070.77 4614.96,1125.77 4823,1333.81 4823,1366.81 4831.18,1374.98 4919.18,1374.98 4971.25,1427.06 5102.94,1427.06 5110,1420 5110,1396.89 5098.12,1385.02 5093.95,1385.02 5091,1387.97 v1(5091,1405)
  Bottom Layer w5.04: v6(1726,290) C155.2@1726,311
  Bottom Layer w8: v1(5091,1405) J1.C14@5116,1430
SERIAL_OUT7_T_N: C148.2 J1.A15 | length 3612.4
  Signal 2 w5.16: v2(1970,1945) 1982.17,1957.17 2174.83,1957.17 2547,1585 4295,1585 4407,1473 4947,1473 4995,1425 5095.86,1425 5111.34,1409.52 5111.34,1394.72 5131.4,1374.67 5187.98,1374.67 5191,1371.65 v1(5191,1355)
  Bottom Layer w5.04: C148.2@1899,1940 1905.48,1946.48 1905.48,1949.53 1908.43,1952.48 1952.51,1952.48 1955.01,1954.98 1960.02,1954.98 v2(1970,1945)
  Bottom Layer w8: v1(5191,1355) J1.A15@5216,1380
SERIAL_OUT7_T_P: C147.2 J1.A14 | length 3610.3
  Signal 2 w5.16: v2(1970,1975) 1975,1975 1982.17,1967.83 2179.24,1967.83 2551.41,1595.66 4299.41,1595.66 4411.41,1483.66 4951.41,1483.66 4999.42,1435.66 5100.28,1435.66 5122,1413.94 5122,1399.14 5135.81,1385.33 5187.98,1385.33 5191,1388.35 v1(5191,1405)
  Bottom Layer w5.04: C147.2@1899,1975 1905.48,1968.52 1905.48,1965.47 1908.43,1962.52 1948.35,1962.52 1950.85,1965.02 1960.02,1965.02 v2(1970,1975)
  Bottom Layer w8: v1(5191,1405) J1.A14@5216,1430
SHUTTER_B_N: J1.D18 U1.42 | length 4735.2
  Top Layer w5: 1283,421.05 U1.42@1283,442
  Top Layer w5.04: v2@1230,264 1230,264.45 1220.02,274.43 1220.02,300.02 1258.48,338.48 1258.48,396.53 1283,421.05
  Signal 1 w5.16: v2(1230,255) 1230,255.77 1220.33,265.44 1220.33,330.26 1251.66,361.59 1251.66,396.21 1283.45,428 1308.04,428 1384.66,504.62 1384.66,563.48 1404.66,583.48 1404.66,699.66 1650,945 2375,945 2417.74,945 cw(c2417.74,938.98) 2423.76,938.98 2423.76,937.01 ccw(c2429.79,937.01) 2429.79,930.99 2457.9,930.99 ccw(c2457.9,937.01) 2463.92,937.01 2463.92,938.98 cw(c2469.95,938.98) 2469.95,945 2540.63,945 2640,945 2839.34,1144.34 3039.34,1144.34 3170,1275 3490.93,1275 3537.05,1228.88 4367.88,1228.88 4393.34,1254.34 4645.59,1254.34 4675.26,1224.67 5037.98,1224.67 5041,1221.65 v1(5041,1205)
  Bottom Layer w8: v1(5041,1205) J1.D18@5066,1230
SHUTTER_B_P: J1.D17 U1.41 | length 4735.2
  Top Layer w5: 1273,425.26 U1.41@1273,442
  Top Layer w5.04: v2@1200,264 1200,264.45 1209.98,274.43 1209.98,304.18 1248.44,342.64 1248.44,400.69 1272.98,425.22
  Signal 1 w5.16: v2(1200,255) 1200,255.77 1209.67,265.44 1209.67,334.67 1241,366 1241,400.62 1279.04,438.66 1303.63,438.66 1374,509.03 1374,567.89 1394,587.89 1394,704.07 1645.59,955.66 2635.59,955.66 2834.93,1155 3034.93,1155 3165.59,1285.66 3495.34,1285.66 3541.46,1239.54 4363.46,1239.54 4388.93,1265 4650,1265 4679.67,1235.33 5037.98,1235.33 5041,1238.35 v1(5041,1255)
  Bottom Layer w8: v1(5041,1255) J1.D17@5066,1280
SHUTTER_T_N: J1.G22 U1.189 | length 4607.5
  Top Layer w5: U1.189@1285,1768 1285,1779.5 1285.02,1786.98
  Top Layer w5.04: 1285,1787 1285,1790.17 1274.04,1801.13 1274.04,1848.84 1287.02,1861.82 1287.02,1893.57 1297,1903.55 v2(1297,1904)
  Signal 2 w5.16: v2(1297,1904) 1297,1903.23 1287.33,1893.56 1287.33,1856.67 1271.66,1841 1271.66,1803.42 1285.66,1789.42 1285.66,1734.42 1304.52,1715.55 1311.54,1708.54 1326,1694.07 1326,1580.07 1735.78,1170.29 1740.41,1165.66 2954.41,1165.66 3190.07,930 3264.93,930 3295.59,960.66 3364.66,960.66 3484.66,1080.66 4425.19,1080.66 4482.85,1023 4593.07,1023 4655.73,1085.66 4904.42,1085.66 4920.66,1069.42 4920.66,1036.07 4909.26,1024.67 4900.44,1024.67 4896.79,1021.02 4896.79,1015.81 4890,1009.02 v1(4890,1005)
  Bottom Layer w8: v1(4890,1005) J1.G22@4915,1030
SHUTTER_T_P: J1.G21 U1.188 | length 4594.2
  Top Layer w5: U1.188@1275,1768 1275,1786
  Top Layer w5.04: v2(1267,1904) 1267,1903.55 1276.98,1893.57 1276.98,1865.98 1264,1853 1264,1797 1269.88,1791.12 1275,1786.03
  Signal 2 w5.16: v2(1267,1904) 1267,1903.23 1276.67,1893.56 1276.67,1861.09 1261,1845.41 1261,1836.58 1261,1799 1275,1785 1275,1730 1293.21,1711.79 1315.34,1689.66 1315.34,1575.66 1731.37,1159.63 1736,1155 2950,1155 3185.66,919.34 3269.34,919.34 3300,950 3369.07,950 3489.07,1070 4420.78,1070 4478.44,1012.34 4597.49,1012.34 4660.15,1075 4900,1075 4910,1065 4910,1040.49 4904.84,1035.33 4904.73,1035.33 4893.02,1035.33 4890,1038.35 v1(4890,1055)
  Bottom Layer w8: v1(4890,1055) J1.G21@4915,1080
T_N: C71.1 U2.2 | length 94.2
  Top Layer w5: C71.1@3114,1090 3120.5,1096.5 3122.43,1096.5 3123.43,1097.5 3157.44,1097.5 3164.78,1090.16 3189.65,1090.16 3194.49,1085.32 U2.2@3200,1085.32
T_P: C70.1 U2.1 | length 94.2
  Top Layer w5: C70.1@3114,1115 3120.5,1108.5 3122.43,1108.5 3123.43,1107.5 3161.58,1107.5 3168.92,1100.16 3189.65,1100.16 3194.49,1105 U2.1@3200,1105
TDI_TDO: J1.D30 J1.D31 | length 750.8
  Top Layer w8: v1(5040,605) 5014,631 5014,713 5030,729 5226,729 5259,696 5259,667 5221,629 5166,629 5114,681 5066,681 v1(5040,655)
  Bottom Layer w16: v1(5040,605) J1.D31@5065,580 ; v1(5040,655) J1.D30@5065,630
TESTOUT_B_N: J1.G25 U1.126 | length 3571.4
  Top Layer w5.04: U1.126@1834,467 1834.02,412.03 1823,401 1823,363.23 1837.74,348.48 2004.89,348.48 2041.32,384.91 2118.8,384.91 2374.96,641.07 2374.96,647.56 2412.18,684.77 2413.98,686.57 2457.31,729.9 2457.31,738.4 2454.97,740.73 2454.97,749.22 2474.79,769.04 2483.29,769.04 2485.62,766.71 2494.11,766.71 2524.2,796.8 2524.2,800.97 2539.63,816.4 2539.63,820.57 2530.19,830 v2(2530,830)
  Signal 2 w5.16: v2(2530,830) 2533.47,830 2537.68,825.79 2539.15,825.79 2542.17,822.77 2542.17,814.08 2601.91,754.34 3276.34,754.34 3313.46,791.46 3379.46,791.46 3386.11,784.82 3978.52,784.82 4068.37,874.67 4887.98,874.67 4891,871.65 v1(4891,855)
  Bottom Layer w8: v1(4891,855) J1.G25@4916,880
TESTOUT_B_P: J1.G24 U1.125 | length 3567
  Top Layer w5.04: U1.125@1823.5,467 1823.5,465.54 1823.96,465.07 1823.96,462.84 ; 1823.99,462.82 1823.99,416.18 1812.96,405.16 1812.96,359.07 1833.59,338.44 2009.05,338.44 2045.48,374.87 2118.8,374.87 2122.96,374.87 2385,636.91 2385,643.4 2424.02,682.42 2537.8,796.2 2537.8,800.37 2550.15,812.73 2550.15,820.87 v2@2556.8,827.52
  Signal 2 w5.16: v2(2565,830) 2561.53,830 2557.32,825.79 2555.85,825.79 2552.83,822.77 2552.83,818.5 2606.33,765 3271.93,765 3309.05,802.12 3383.88,802.12 3387,799 3390.52,795.48 3974.11,795.48 4063.96,885.33 4887.98,885.33 4891,888.35 v1(4891,905)
  Bottom Layer w8: v1(4891,905) J1.G24@4916,930
TESTOUT_T_N: J1.H17 U1.273 | length 3431.2
  Top Layer w5: U1.273@1834,1743 1834,1783.8 1834.02,1792.95 1833.98,1792.98
  Top Layer w5.04: 1833.98,1792.98 1833.18,1792.98 1826.94,1799.22 1826.94,1824.71 1850.23,1848 1913.23,1848 1919.72,1854.49 1969.72,1854.49 1972.74,1857.52 2048.29,1857.52 2190.81,1715 2205.84,1699.96 2290.04,1699.96 2347.5,1642.5 2349.28,1640.72 2377.59,1612.41 2377.59,1603.91 2375.46,1601.78 2375.46,1593.29 2395.27,1573.47 2403.77,1573.47 2405.9,1575.6 2414.39,1575.6 2448.22,1541.78 2450,1540 2525,1465 2553.07,1436.93 2823.07,1436.93 2852.52,1407.48 2992.52,1407.48 v2(3005,1395)
  Signal 2 w5.16: v2(3005,1395) 3006.1,1395 3015.44,1404.34 3016.98,1404.34 3874.59,1404.34 3920.59,1358.34 4223.49,1358.34 4280.95,1300.88 4789.12,1300.88 4815.33,1274.67 4837.98,1274.67 4841,1271.65 v1(4841,1255)
  Bottom Layer w8: v1(4841,1255) J1.H17@4866,1280
TESTOUT_T_P: J1.H16 U1.272 | length 3433.7
  Top Layer w5: U1.272@1824,1743 1824,1787.97
  Top Layer w5.04: 1824,1787.97 1816.9,1795.07 1816.9,1828.87 1846.07,1858.04 1909.07,1858.04 1912.62,1861.59 1915.56,1864.53 1965.56,1864.53 1968.59,1867.56 2052.44,1867.56 2210,1710 2294.19,1710 2557.23,1446.96 2827.23,1446.96 2856.68,1417.52 2992.52,1417.52 v2(3005,1430)
  Signal 2 w5.16: v2(3005,1430) 3020,1415 3879,1415 3925,1369 4227.9,1369 4260.57,1336.33 4264.34,1332.56 4285.36,1311.54 4793.54,1311.54 4819.74,1285.33 4837.98,1285.33 4841,1288.35 v1(4841,1305)
  Bottom Layer w8: v1(4841,1305) J1.H16@4866,1330
TO_SYNC_B_N: J1.D21 U1.46 | length 4422
  Top Layer w5.04: v2(1285,290) 1285,290.45 1275.02,300.43 1275.02,314.9 1303.61,343.5 1303.61,370.93 1323.56,390.88 1323.56,443.74 1312.96,454.34 1312.96,457.37 1312.27,458.06 1312.27,465.27 1312.5,465.5 U1.46@1312.5,467
  Signal 1 w5.16: v2(1285,290) 1285,291.05 1275.6,300.44 1275.6,310.6 1286.34,321.34 1881.48,321.34 1890.48,330.34 2195.41,330.34 2420.04,554.96 2507.05,641.98 cw(c2511.31,637.72) 2515.57,641.98 2516.95,640.6 ccw(c2521.21,644.86) 2525.47,640.6 2545.35,660.47 ccw(c2541.09,664.73) 2545.35,668.99 2543.97,670.37 cw(c2548.23,674.63) 2543.97,678.89 2574.02,708.94 2590.07,725 3150,725 3255,830 3435.07,830 3554.42,949.34 3719.49,949.34 3829.15,1059 4446.85,1059 4493.51,1012.34 4617.49,1012.34 4679.15,1074 4970.71,1074 4971.38,1074.67 5037.98,1074.67 5041,1071.65 v1(5041,1055)
  Bottom Layer w8: v1(5041,1055) J1.D21@5066,1080
TO_SYNC_B_P: J1.D20 U1.45 | length 4422.2
  Top Layer w5.04: v2(1255,290) 1255,290.45 1264.98,300.43 1264.98,319.06 1293.57,347.65 1293.57,375.09 1313.52,395.03 1313.52,439.58 1302.92,450.18 1302.92,453.22 1302.23,453.9 1302.23,466.77 U1.45@1302,467
  Signal 1 w5.16: v2(1255,290) 1255,290.5 1264.94,300.44 1264.94,315.02 1281.93,332 1877.07,332 1886.07,341 2191,341 2585.66,735.66 3145.59,735.66 3250.59,840.66 3430.66,840.66 3550,960 3715.07,960 3824.73,1069.66 4451.27,1069.66 4497.93,1023 4613.07,1023 4674.73,1084.66 4966.3,1084.66 4966.97,1085.33 5037.98,1085.33 5041,1088.35 v1(5041,1105)
  Bottom Layer w8: v1(5041,1105) J1.D20@5066,1130
TO_SYNC_T_N: J1.G19 U1.193 | length 4559.9
  Top Layer w5: U1.193@1315,1742.49 1315,1742.89 1315.01,1785.07 1324.54,1794.59 1324.54,1925.8 1315,1935.34
  Top Layer w5.04: v2(1309.02,1983) 1309.02,1978.95 1299.04,1968.97 1299.04,1951.33 1315,1935.37
  Signal 2 w5.16: v2(1309.02,1983) 1309.02,1982.23 1299.35,1972.56 1299.35,1952.65 1330,1922 1333.77,1918.23 1349.66,1902.34 1349.66,1744.41 1381.3,1712.77 1381.3,1628.7 1760.66,1249.34 2309.34,1249.34 2388.24,1328.24 3051.69,1328.24 3099.93,1280 3778.45,1280 3818.45,1240 4350.55,1240 4366.21,1255.66 4569.12,1255.66 4589.78,1235 4905,1235 4920,1220 4920,1183.94 4910.73,1174.67 4894.02,1174.67 4891,1171.65 v1(4891,1155)
  Bottom Layer w8: v1(4891,1155) J1.G19@4916,1180
TO_SYNC_T_P: J1.G18 U1.192 | length 4559.4
  Top Layer w5.04: v2(1279.02,1983) 1279.02,1978.95 1289,1968.97 1289,1947.17 1314.52,1921.65 1314.52,1798.74 1304.98,1789.21 U1.192@1305,1743
  Signal 2 w5.16: v2(1279.02,1983) 1279.02,1982.23 1288.69,1972.56 1288.69,1948.24 1339,1897.93 1339,1740 1370.64,1708.36 1370.64,1624.28 1756.24,1238.68 2313.76,1238.68 2392.65,1317.58 2525.05,1317.58 2628.72,1317.58 cw(c2628.72,1311.56) 2634.74,1311.56 2634.74,1309.6 ccw(c2640.76,1309.6) 2640.76,1303.58 2668.88,1303.58 ccw(c2668.88,1309.6) 2674.9,1309.6 2674.9,1311.56 cw(c2680.92,1311.56) 2680.92,1317.58 2683.5,1317.58 3047.27,1317.58 3095.51,1269.34 3774.04,1269.34 3814.04,1229.34 4354.97,1229.34 4370.63,1245 4564.71,1245 4585.37,1224.34 4900.59,1224.34 4909.34,1215.59 4909.34,1188.35 4906.32,1185.33 4894.02,1185.33 4891,1188.35 v1(4891,1205)
  Bottom Layer w8: v1(4891,1205) J1.G18@4916,1230
TPX4_RefClk_N: C73.1 J1.H32 | length 2024
  Top Layer w5.04: C73.1@3404,1063 3410.48,1069.48 3412.43,1069.48 3413.43,1070.48 3577.9,1070.48 3622.49,1115.07 4124.93,1115.07 4180.04,1059.96 4459.16,1059.96 4504.18,1104.98 4527.05,1104.98 4530,1102.03 v2(4530,1085)
  Bottom Layer w5.04: v2(4530,1085) 4532.7,1087.7 4532.7,1102.01 4535.65,1104.96 4560.84,1104.96 4679.96,985.84 4679.96,608.44 4738.43,549.98 4831.9,549.98 4854.25,549.98 4857.2,547.03 4857.2,544.2 4866,535.4 J1.H32@4866,530
TPX4_RefClk_P: C72.1 J1.H31 | length 2025.2
  Top Layer w5.04: C72.1@3404,1088 3410.48,1081.52 3412.43,1081.52 3413.43,1080.52 3573.74,1080.52 3618.33,1125.11 4129.08,1125.11 4184.19,1070 4455,1070 4500.02,1115.02 4527.05,1115.02 4530,1117.97 v2(4530,1135)
  Bottom Layer w5.04: v2(4530,1135) 4530.64,1134.36 4530.64,1117.95 4533.59,1115 4565,1115 4690,990 4690,612.6 4742.58,560.02 4836.06,560.02 4854.25,560.02 4857.2,562.97 4857.2,565.8 4866,574.6 J1.H31@4866,580
U3_EN: JMP2.1 U3.14 | length 224.8
  Top Layer w8: U3.14@3949.96,1879.69 4005.31,1879.69 4023.44,1861.56 4023.44,1816.56 4065,1775 JMP2.1@4065,1735
U3_FB: C91.2 R23.1 R24.2 U3.3 | length 140.2
  Top Layer w8: R24.2@3685,1872.56 3724.88,1872.56 R23.1@3735,1862.44 3737.44,1860 U3.3@3820.04,1860
U4_EN: JMP3.1 U4.14 | length 224.8
  Top Layer w8: U4.14@3949.96,214.69 4005.31,214.69 4023.44,196.56 4023.44,151.56 4065,110 JMP3.1@4065,70
U4_FB: C111.2 R25.1 R26.2 U4.3 | length 138.1
  Top Layer w6: C111.2@3781.91,195 U4.3@3820.04,195
  Top Layer w8: R26.2@3690,202.56 3734.88,202.56 3740,197.44 3747.44,190 3748.66,191.22 3780,191.22 3780.49,192.19 C111.2@3781.91,195
U5_ADJ: R13.2 R27.1 U5.7 | length 112.5
  Top Layer w10: R13.2@4007.56,840 R27.1@4007.56,795 4017.4,785.16 U5.7@4071,785.16
U5_EN: JMP6.1 U5.5 | length 99.8
  Top Layer w10: U5.5@4071,824.53 4071,872 4079,880 JMP6.1@4120,880
U6_ADJ: R14.2 R28.1 U6.7 | length 112.5
  Top Layer w10: R14.2@4007.56,1335 R28.1@4007.56,1290 4017.4,1280.16 U6.7@4071,1280.16
U6_EN: JMP8.1 U6.5 | length 114.2
  Top Layer w10: U6.5@4071,1319.53 4074,1319.53 4075,1320.53 4075,1372 4083,1380 JMP8.1@4130,1380
U14_VREF2: C177.1 R38.2 U14.7 U14.8 | length 270.2
  Bottom Layer w6: U14.7@504.2,278.8 501.85,281.15 462.95,281.15 460,284.1 460,300.3 464.1,304.4 U14.8@504.2,304.4
  Bottom Layer w7: R38.2@495,372.44 C177.1@555,372.44 555,353.44 536.56,335 515,335 504.2,324.2 U14.8@504.2,304.4
VADJ: J1.E39 J1.F40 J1.G39 J1.H40 TP19.1 | length 141.4
  Bottom Layer w8: v1(4841,105) J1.H40@4866,130 ; v1(4891,155) J1.G39@4916,180 ; v1(4941,105) J1.F40@4966,130 ; v1(4991,155) J1.E39@5016,180